# Altium PCB PM-DB27408+.PcbDoc
Units mm, origin at the board's own origin, x right, y up, seen from the top; angles counter-clockwise.
Board outline 55 x 36.5 mm, 2 copper layers (Top Layer, Bottom Layer); 5 components, 100 nets, 64 pads, 0 vias.
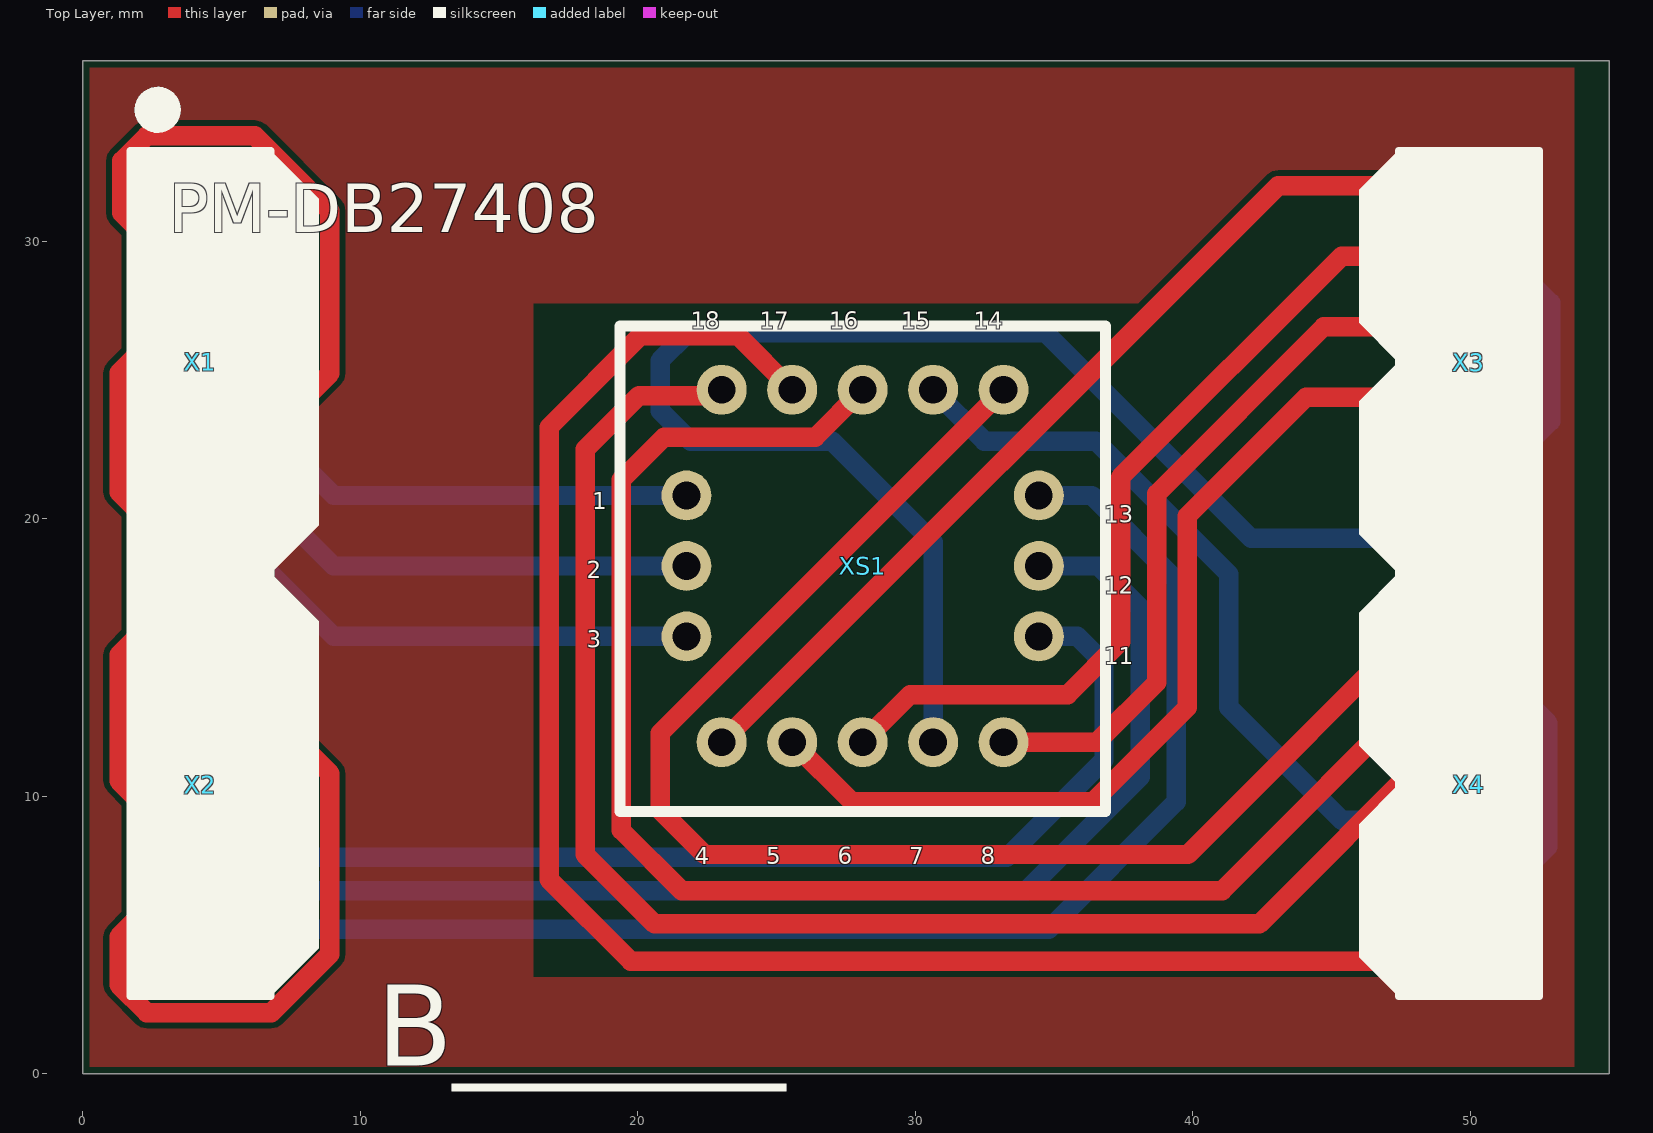
[diagram p0: Top Layer view]
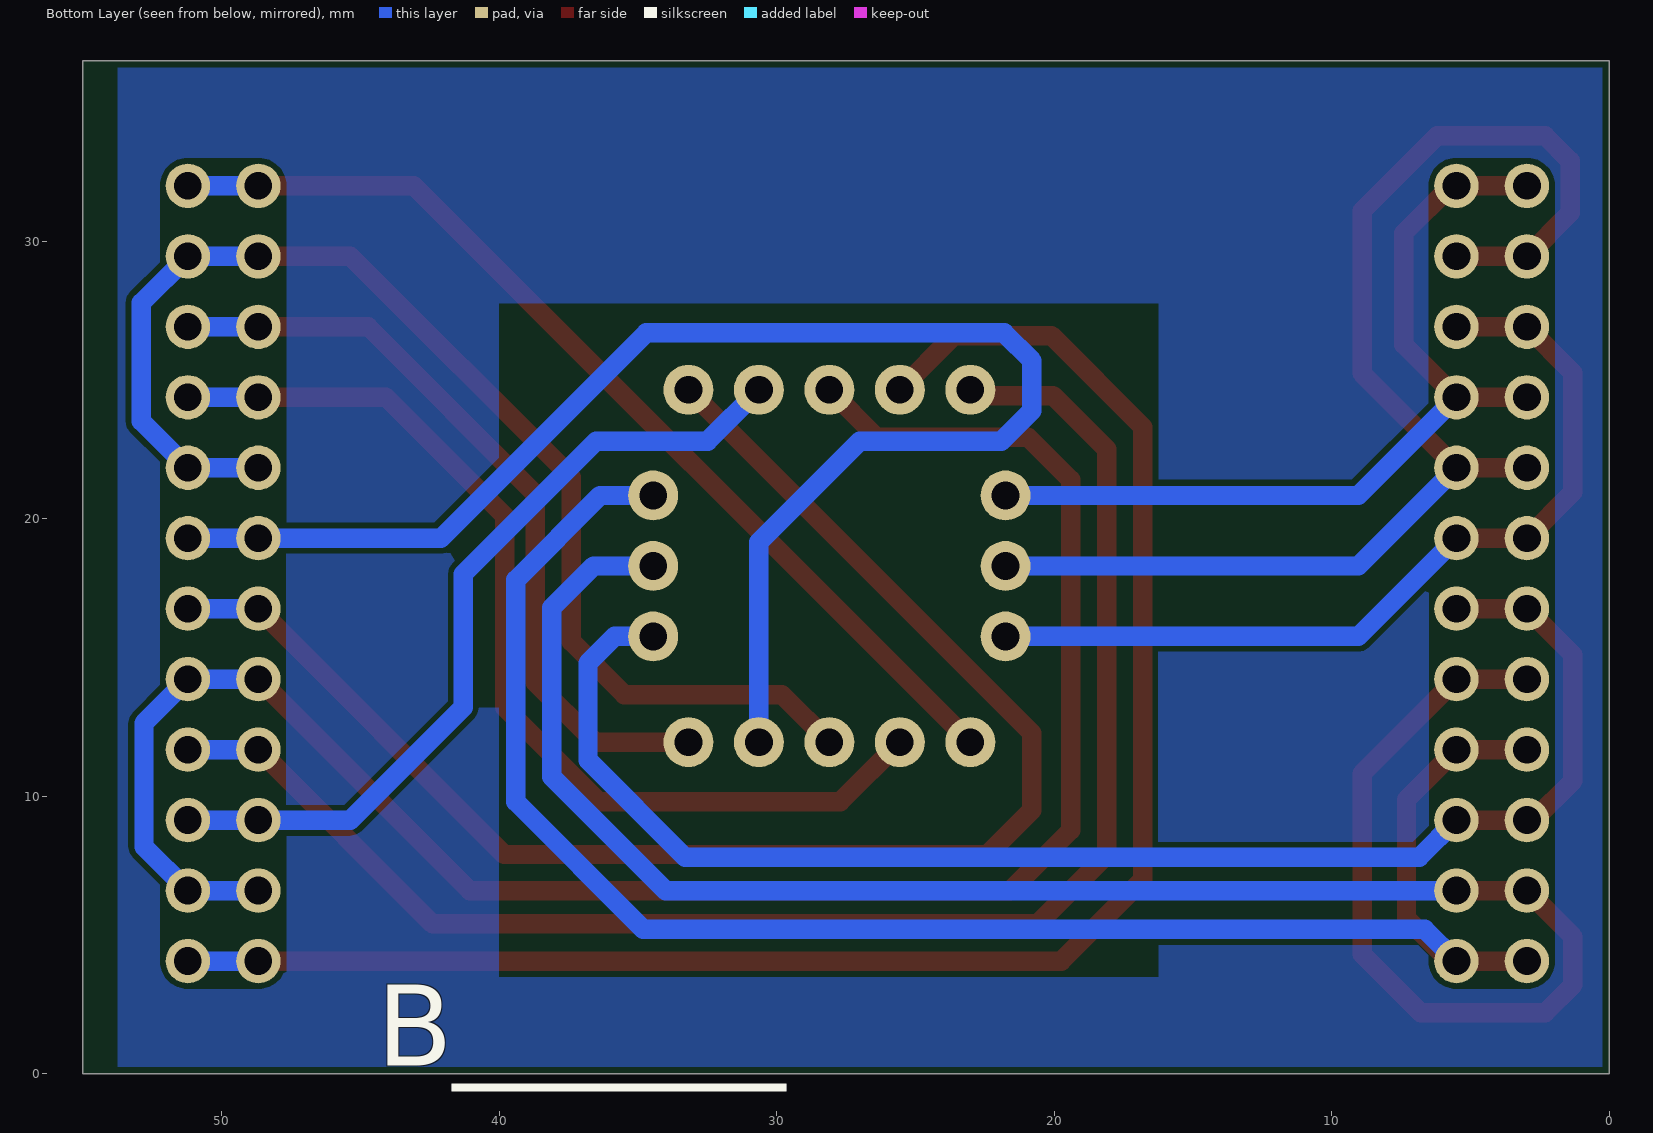
[diagram p1: Bottom Layer view, seen from below]
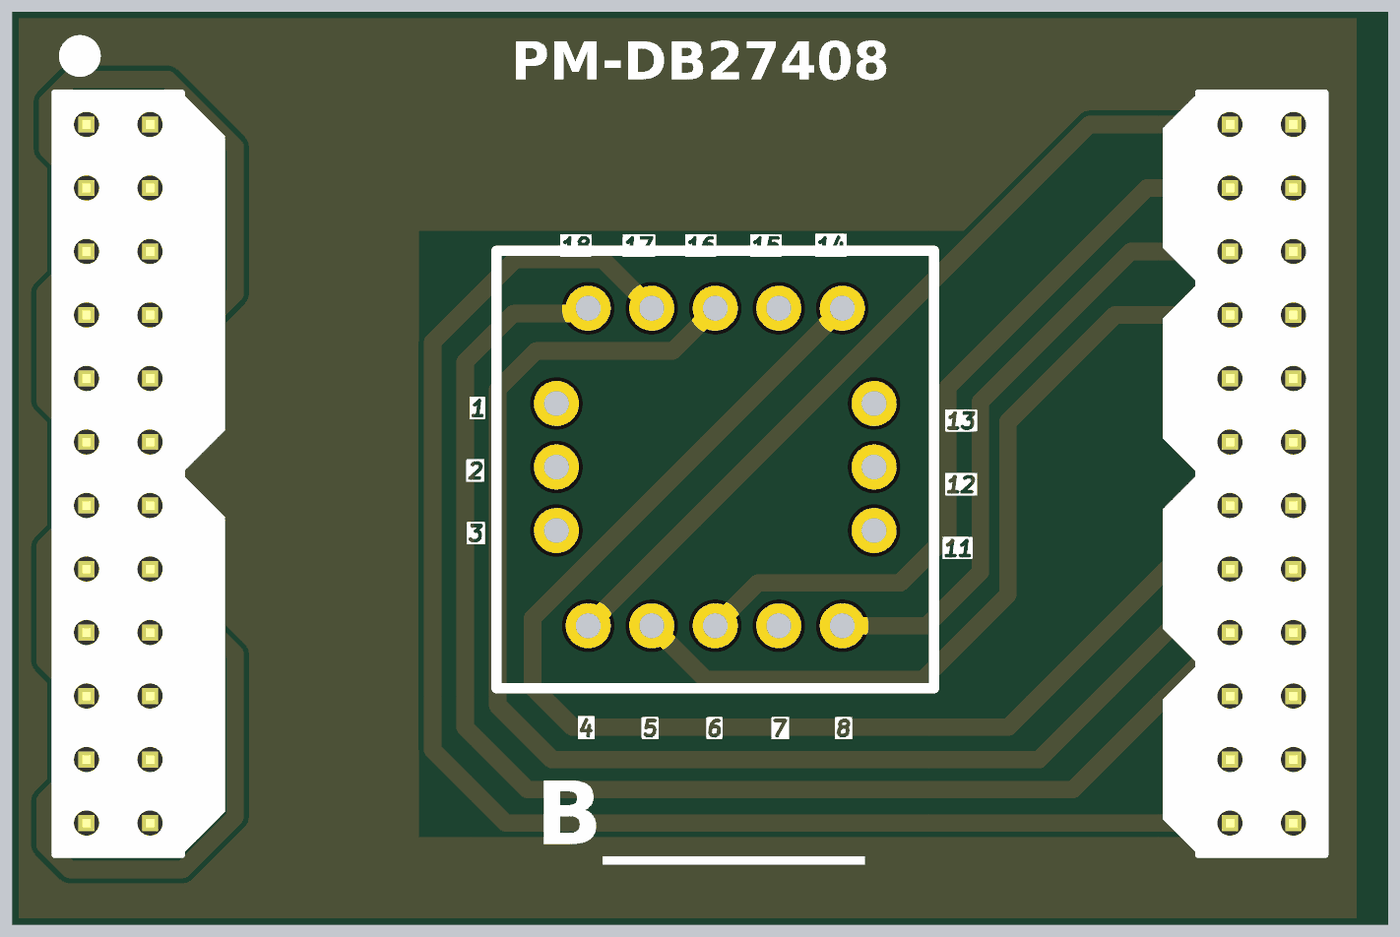
[diagram p2: 3D render of the assembled board from above, using the file's embedded part models]

## Layer stack, top to bottom
Top Solder: solder mask 0.0102, Solder Resist, Dk 3.5
Top Layer: signal copper 0.0356
Dielectric 1: dielectric 0.32, FR-4, Dk 4.8
Bottom Layer: signal copper 0.0356
Bottom Solder: solder mask 0.0102, Solder Resist, Dk 3.5

## Board outline
0,0 0,36.5 55,36.5 55,0

## Design rules (kind name [scope] priority, off if disabled: settings)
Clearance [All] p1: gap=0.2 ignorepadtopadclearanceinfootprint=FALSE except(0: Arc-Hole Track-Hole SMDPad-Hole THPad-Hole Via-Hole Fill-Hole Poly-Hole Region-Hole Text-Hole)
ComponentClearance [All] p1 off: gap=0.254 collisioncheckmode=3 verticalgap=0.254 showdistances=FALSE
DiffPairsRouting [All] p1: maxlimit=0.15 minlimit=0.15 mostfreqgap=0.15 toplayer_minwidth=0.25 toplayer_maxwidth=0.25 toplayer_prefwidth=0.25 bottomlayer_minwidth=0.25 bottomlayer_maxwidth=0.25 bottomlayer_prefwidth=0.25 maxuncoupledlength=10
HoleSize [All] p1: absolutevalues=TRUE maxlimit=999 minlimit=0.1 maxpercent=80.000 minpercent=20.000
MinimumAnnularRing [All] p1: minimumring=0.15
MinimumSolderMaskSliver [All] p1: minsoldermaskwidth=0.15
PlaneClearance [All] p1: clearance=0.3
PlaneConnect [All] p1: planeconnectstyle=Relief reliefexpansion=0.5 reliefentries=4 reliefconductorwidth=0.25 reliefairgap=0.3
PolygonConnect PolygonConnect_Via [IsVia] p1: connectstyle=Direct reliefconductorwidth=0.25 reliefentries=4 polygonreliefangle="90 Angle" airgapwidth=0.25
PolygonConnect PolygonConnect_1 [All] p2: connectstyle=Relief reliefconductorwidth=0.25 reliefentries=4 polygonreliefangle="90 Angle" airgapwidth=0.25
RoutingVias [All] p1: holewidth=0.8 width=1.2 viastyle="Through Hole" minholewidth=0.25 minwidth=0.5 maxholewidth=5 maxwidth=10
SilkToSilkClearance [All] p1: silktosilkclearance=0
SilkToSolderMaskClearance [IsPad vs IsText] p1: minsilkscreentomaskgap=0.05 clearancetoexposedcopper=TRUE
SolderMaskExpansion [All] p1: expansion=0.05 istentingtop=FALSE
Width [All] p1: maxlimit=10 minlimit=0.15 preferedwidth=0.5 minimp=50.000000 maximp=50.000000 favimp=50.000000
22 further rules are at their usual default settings.

## Components (designator, comment, footprint, x,y, rotation, side; value= is the part's Value field where it differs from the comment)
X1 "PLD-12" PLD-12 2.96,32 r0 top locked
X2 "PLD-12" PLD-12 2.96,16.76 r0 top locked
X3 "PLD-12" PLD-12 48.68,32 r0 top locked
X4 "PLD-12" PLD-12 48.68,16.76 r0 top locked
XS1 "PM-DB27408" 7H 28.1,18.3 r90 top

## Footprints (in the part's own frame and the unit in brackets; to place one, negate y for a bottom-side part, rotate by r counter-clockwise, add the part's x,y. Pads: shape width x height; smd on the part's side, far side on the other; paste and mask are expansions set on the pad)
7H [mm]
  round 1.8 hole 1 mask+0.15: 1(2.54,6.35) 2(0,6.35) 3(-2.54,6.35) 4(-6.35,5.08) 5(-6.35,2.54) 6(-6.35,0) 7(-6.35,-2.54) 8(-6.35,-5.08) 11(-2.54,-6.35) 12(0,-6.35) 13(2.54,-6.35) 14(6.35,-5.08) 15(6.35,-2.54) 16(6.35,0) 17(6.35,2.54) 18(6.35,5.08)
  silkscreen extent -8.85,-8.75 8.65,8.75
PLD-12 [mm] "KUPPLS"
  round 1.6 hole 1: 1(0,0) 1(2.54,0) 2(0,-2.54) 2(2.54,-2.54) 3(0,-5.08) 3(2.54,-5.08) 4(0,-7.62) 4(2.54,-7.62) 5(0,-10.16) 5(2.54,-10.16) 6(0,-12.7) 6(2.54,-12.7)
  silkscreen extent -1.27,-13.97 3.81,1.27, body extent -1.23,-13.97 3.77,1.27, height 8.4

## Nets (pads, with @x,y where several pads share a name; then routed paths per layer and width w, separated by ;. In a path a pad name is that pad's centre, name@x,y a point inside that pad or via, vN(x,y) a via of type N, cw(c..) or ccw(c..) an arc to the next point about the centre after c; other vN are vias at no path point)
+5V: 
DO1: 
DO2: 
GND: 
GNDA: 
IN1+: X1.1 X1.4 XS1.1 | length 32.1
  Top Layer w0.7: X1.4@2.96,24.38 5.5,24.38 7.4,26.28 7.4,30.3 5.7,32 5.5,32 X1.1@2.96,32
  Bottom Layer w0.7: X1.4@5.5,24.38 9.04,20.84 XS1.1
IN1-: X1.3 X1.6 XS1.3 | length 31.8
  Top Layer w0.7: X1.6@5.5,19.3 2.96,19.3 1.3,20.96 1.3,25.26 2.96,26.92 X1.3@5.5,26.92
  Bottom Layer w0.7: X1.6@5.5,19.3 9.04,15.76 XS1.3
In2+: X2.1 X2.4 XS1.11 | length 53.8
  Top Layer w0.7: X2.4@5.5,9.14 2.96,9.14 2.716,9.14 1.3,10.556 1.3,15.1 2.96,16.76 X2.1@5.5,16.76
  Bottom Layer w0.7: X2.4@5.5,9.14 6.84,7.8 33.3,7.8 36.8,11.3 36.8,14.8 35.84,15.76 XS1.11
In2-: X2.3 X2.6 XS1.13 | length 64.8
  Top Layer w0.7: X2.6@2.96,4.06 5.5,4.06 5.744,4.06 6.789,5.105 6.805,5.105 7.3,5.6 7.3,9.88 5.5,11.68 X2.3@2.96,11.68
  Bottom Layer w0.7: X2.6@5.5,4.06 6.64,5.2 34.8,5.2 39.4,9.8 39.4,17.8 36.36,20.84 XS1.13
INC1: X1.2 X1.5 XS1.2 | length 46.5
  Top Layer w0.7: X1.5@2.96,21.84 5.5,21.84 8.9,25.24 8.9,31.1 6.2,33.8 2.3,33.8 1.4,32.9 1.4,31.02 2.96,29.46 X1.2@5.5,29.46
  Bottom Layer w0.7: X1.5@5.5,21.84 9.04,18.3 XS1.2
INC2: X2.2 X2.5 XS1.12 | length 74
  Top Layer w0.7: X2.2@2.96,14.22 5.5,14.22 8.9,10.82 8.9,4.31 6.79,2.2 2.3,2.2 1.3,3.2 1.3,4.94 2.96,6.6 X2.5@5.5,6.6
  Bottom Layer w0.7: X2.5@5.5,6.6 34,6.6 38.1,10.7 38.1,16.8 36.6,18.3 XS1.12
NetR1_2: 
NetR2_2: 
NetR3_2: 
NetR4_2: 
NetR5_2: 
NetR6_2: 
NetR7_2: 
NetR8_2: 
NetR9_2: 
NetR10_2: 
NetR11_2: 
NetR12_2: 
NetR13_2: 
NetR14_2: 
NetR15_2: 
NetR16_2: 
NetR17_2: 
NetR18_2: 
NetR19_2: 
NetR20_2: 
NetR21_2: 
NetR22_2: 
NetR23_2: 
NetR24_2: 
NetR25_2: 
NetR26_2: 
NetR27_2: 
NetR28_2: 
NetR29_2: 
NetR30_2: 
NetR31_2: 
NetR32_2: 
NetR33_2: 
NetR34_2: 
NetR35_2: 
NetR36_2: 
NetR37_2: 
NetR38_2: 
OUT1+: X3.1 XS1.4 | length 36.5
  Top Layer w0.7: XS1.4 43.07,32 X3.1@48.68,32
  Bottom Layer w0.7: X3.1@48.68,32 X3.1@51.22,32
OUT1-: X3.3 XS1.8 | length 28.2
  Top Layer w0.7: XS1.8 36.55,11.95 38.7,14.1 38.7,20.9 44.72,26.92 X3.3@48.68,26.92
  Bottom Layer w0.7: X3.3@48.68,26.92 X3.3@51.22,26.92
OUT1C: X3.2 X3.5 XS1.6 | length 45.4
  Top Layer w0.7: XS1.6 29.81,13.66 35.487,13.66 37.4,15.573 37.4,21.5 45.36,29.46 X3.2@48.68,29.46
  Bottom Layer w0.7: X3.5@48.68,21.84 51.22,21.84 52.9,23.52 52.9,27.78 51.22,29.46 X3.2@48.68,29.46
OUT1C1: X3.4 XS1.5 | length 36.6
  Top Layer w0.7: XS1.5 27.71,9.8 36.4,9.8 39.8,13.2 39.8,20.1 44.08,24.38 X3.4@48.68,24.38
  Bottom Layer w0.7: X3.4@48.68,24.38 X3.4@51.22,24.38
OUT1C2: X3.6 XS1.7 | length 54.7
  Bottom Layer w0.7: XS1.7 30.64,19.16 27,22.8 21.9,22.8 20.8,23.9 20.8,25.7 21.8,26.7 34.7,26.7 42.1,19.3 48.68,19.3 X3.6@51.22,19.3
OUT2+: X4.1 XS1.14 | length 55
  Top Layer w0.7: XS1.14 20.8,12.27 20.8,9.5 22.4,7.9 39.82,7.9 X4.1@48.68,16.76
  Bottom Layer w0.7: X4.1@48.68,16.76 X4.1@51.22,16.76
OUT2-: X4.3 XS1.18 | length 57.3
  Top Layer w0.7: XS1.18 22.81,24.44 20.04,24.44 18.1,22.5 18.1,7.9 20.6,5.4 42.4,5.4 X4.3@48.68,11.68
  Bottom Layer w0.7: X4.3@48.555,11.805 48.68,11.68 X4.3@51.22,11.68
OUT2C: X4.2 X4.5 XS1.16 | length 70
  Top Layer w0.7: XS1.16 26.39,22.94 20.94,22.94 19.4,21.4 19.4,8.773 21.573,6.6 41.06,6.6 X4.2@48.68,14.22
  Bottom Layer w0.7: X4.5@48.68,6.6 51.22,6.6 52.8,8.18 52.8,12.64 51.22,14.22 X4.2@48.68,14.22
OUT2C1: X4.4 XS1.15 | length 29.8
  Bottom Layer w0.7: XS1.15 32.49,22.8 36.5,22.8 41.3,18 41.3,13.2 45.36,9.14 48.68,9.14 X4.4@51.22,9.14
OUT2C2: X4.6 XS1.17 | length 62.9
  Top Layer w0.7: XS1.17 23.61,26.6 20.1,26.6 16.8,23.3 16.8,7 19.74,4.06 X4.6@48.68,4.06
  Bottom Layer w0.7: X4.6@48.68,4.06 X4.6@51.22,4.06
RELE1: 
RELE2: 
RELE3: 
RELE4: 
RELE5: 
RELE6: 
RELE7: 
RELE8: 
RELE9: 
RELE10: 
RELE11: 
RELE12: 
RELE13: 
RELE14: 
RELE15: 
RELE16: 
RELE17: 
RELE18: 
RELE19: 
RELE20: 
RELE21: 
RELE22: 
RELE23: 
RELE24: 
RELE25: 
RELE26: 
RELE27: 
RELE28: 
RELE29: 
RELE30: 
RELE31: 
RELE32: 
RELE33: 
RELE34: 
RELE35: 
RELE36: 
RELE37: 
RELE38: 
RST_IN: 
VCC: 
VDD: 

## Polygon pours and split planes (outlines as drawn)
no net on Top Layer "NONET_L-01_P-001" (solid, pour order 4): 0.25,36.25 0.25,0.25 53.75,0.25 53.75,36.25
no net on Bottom Layer "NONET_L-01_P-001" (solid, pour order 5): 0.25,36.25 0.25,0.25 53.75,0.25 53.75,36.25

## Other copper
Top Layer:
  pour cut-out: 48.548,33 51.22,33 51.22,32
  pour cut-out: 38.879,27.809 40.652,29.582 43.07,32 48.68,32 48.68,4.06 38.879,4.06
  pour cut-out: 48.68,24.38 51.22,24.38 51.22,11.68 48.68,11.68
  pour cut-out: 47.68,6.732 47.68,4.06 48.68,4.06
  pour cut-out: 47.68,6.732 47.68,32 51.22,32
  pour cut-out: 52.22,32.132 52.22,3.06 48.812,3.06
  pour cut-out: 5.5,6.6 5.5,4.262 8.9,4.262
  pour cut-out: 5.622,4.06 5.622,2.2 6.79,2.2
  pour cut-out: 8.9,10.82 8.9,4.262 5.702,4.262
  pour cut-out: 5.5,14.22 5.5,10.82 8.9,10.82
  pour cut-out: 2.96,21.84 5.5,21.84 5.5,14.22 2.96,14.22
  pour cut-out: 6.5,21.708 6.5,4.06 2.96,4.06
  pour cut-out: 1.4,31.02 8.9,31.02 8.9,24.554 1.4,24.554
  pour cut-out: 8.9,25.24 2.96,25.24 2.96,21.84
  pour cut-out: 1.4,31.02 8.9,31.02 8.9,25.24
  pour cut-out: 2.548,33.8 2.548,31.1 8.9,31.1
  pour cut-out: 6.79,2.2 2.96,2.2 2.96,6.6
  pour cut-out: 1.4,32.9 1.4,4.06 5.5,4.06
  pour cut-out: 16.25,27.75 40,27.75 40,3.5 16.25,3.5
Bottom Layer:
  pour cut-out: 2.96,24.38 5.5,24.38 5.5,11.68 2.96,11.68
  pour cut-out: 9.04,20.84 5.5,24.38 5.5,19.3 9.04,15.76
  pour cut-out: 16.25,18.3 16.25,20.84 9.04,20.84 9.04,18.3
  pour cut-out: 16.25,15.625 9.04,15.625 9.04,18.3 16.25,18.3
  pour cut-out: 6.3,6.6 6.3,5.2 16.837,5.2 16.837,6.6
  pour cut-out: 3.092,3.06 5.5,3.06 5.5,4.06
  pour cut-out: 2.828,33 5.5,33 5.5,32
  pour cut-out: 6.5,3.928 6.5,32 2.96,32
  pour cut-out: 1.96,32.132 1.96,4.06 5.5,4.06
  pour cut-out: 41.3,18 41.3,13.2 39.251,13.2 39.251,20.049
  pour cut-out: 41.3,18 41.3,19.3 42.1,19.3
  pour cut-out: 51.352,3.06 48.68,3.06 48.68,4.06
  pour cut-out: 52.22,32.132 52.22,4.06 48.68,4.06
  pour cut-out: 48.548,33 51.22,33 51.22,32
  pour cut-out: 47.68,3.674 47.68,32 51.22,32
  pour cut-out: 16.25,27.75 40,27.75 40,3.5 16.25,3.5

## Silkscreen, mask and mechanical layers (free items; w line width, h text height)
Top Overlay:
  circle w0.254: c2.693,34.74 r0.707
  region: 47.41,33.27 47.41,2.79 52.49,2.79 52.49,33.27
  region: 1.69,33.19 1.69,2.79 6.77,2.79 6.77,33.23
  region: 47.41,10.41 46,9 46,4.2 47.41,2.79
  region: 47.41,18.03 46,16.62 46,11.82 47.41,10.41
  region: 47.41,25.65 46,24.24 46,19.44 47.41,18.03
  region: 47.41,33.27 46,31.86 46,27.06 47.41,25.65
  region: 6.77,18.03 8.5,16.3 8.5,4.52 6.77,2.79
  region: 6.77,33.27 8.5,31.54 8.5,19.76 6.77,18.03
  region: 2.668,35.446 2.453,35.446 2.06,35.054 2.06,34.376 2.402,34.033 2.93,34.033 3.332,34.436 3.332,35.054
  text "PM-DB27408" at 3.087,29.747 h3
  text "18" at 21.9,26.85 h0.6
  text "17" at 24.4,26.85 h0.6
  text "16" at 26.9,26.85 h0.6
  text "15" at 29.5,26.85 h0.6
  text "14" at 32.1,26.85 h0.6
  text "1" at 18.35,20.35 h0.6
  text "13" at 36.8,19.85 h0.6
  text "2" at 18.15,17.85 h0.6
  text "12" at 36.8,17.3 h0.6
  text "3" at 18.15,15.35 h0.6
  text "11" at 36.8,14.75 h0.6
  text "4" at 22.05,7.55 h0.6
  text "5" at 24.625,7.55 h0.6
  text "6" at 27.2,7.55 h0.6
  text "7" at 29.775,7.55 h0.6
  text "8" at 32.35,7.55 h0.6
  text "B______" at 10.585,-0.67 h5
Bottom Overlay:
  text "B______" at 44.415,-0.67 h5